# Altium PCB Tablet_Design.PcbDoc (part 6 of 6)
Units mil, origin at the board's own origin, x right, y up, seen from the top; angles counter-clockwise.
Board outline 3823 x 4035 mil, 2 copper layers (Top Layer, Bottom Layer), stack 57 mil thick; 254 components, 256 nets, 1099 pads, 445 vias.
Unrouted connection lines stored in the file: 188.
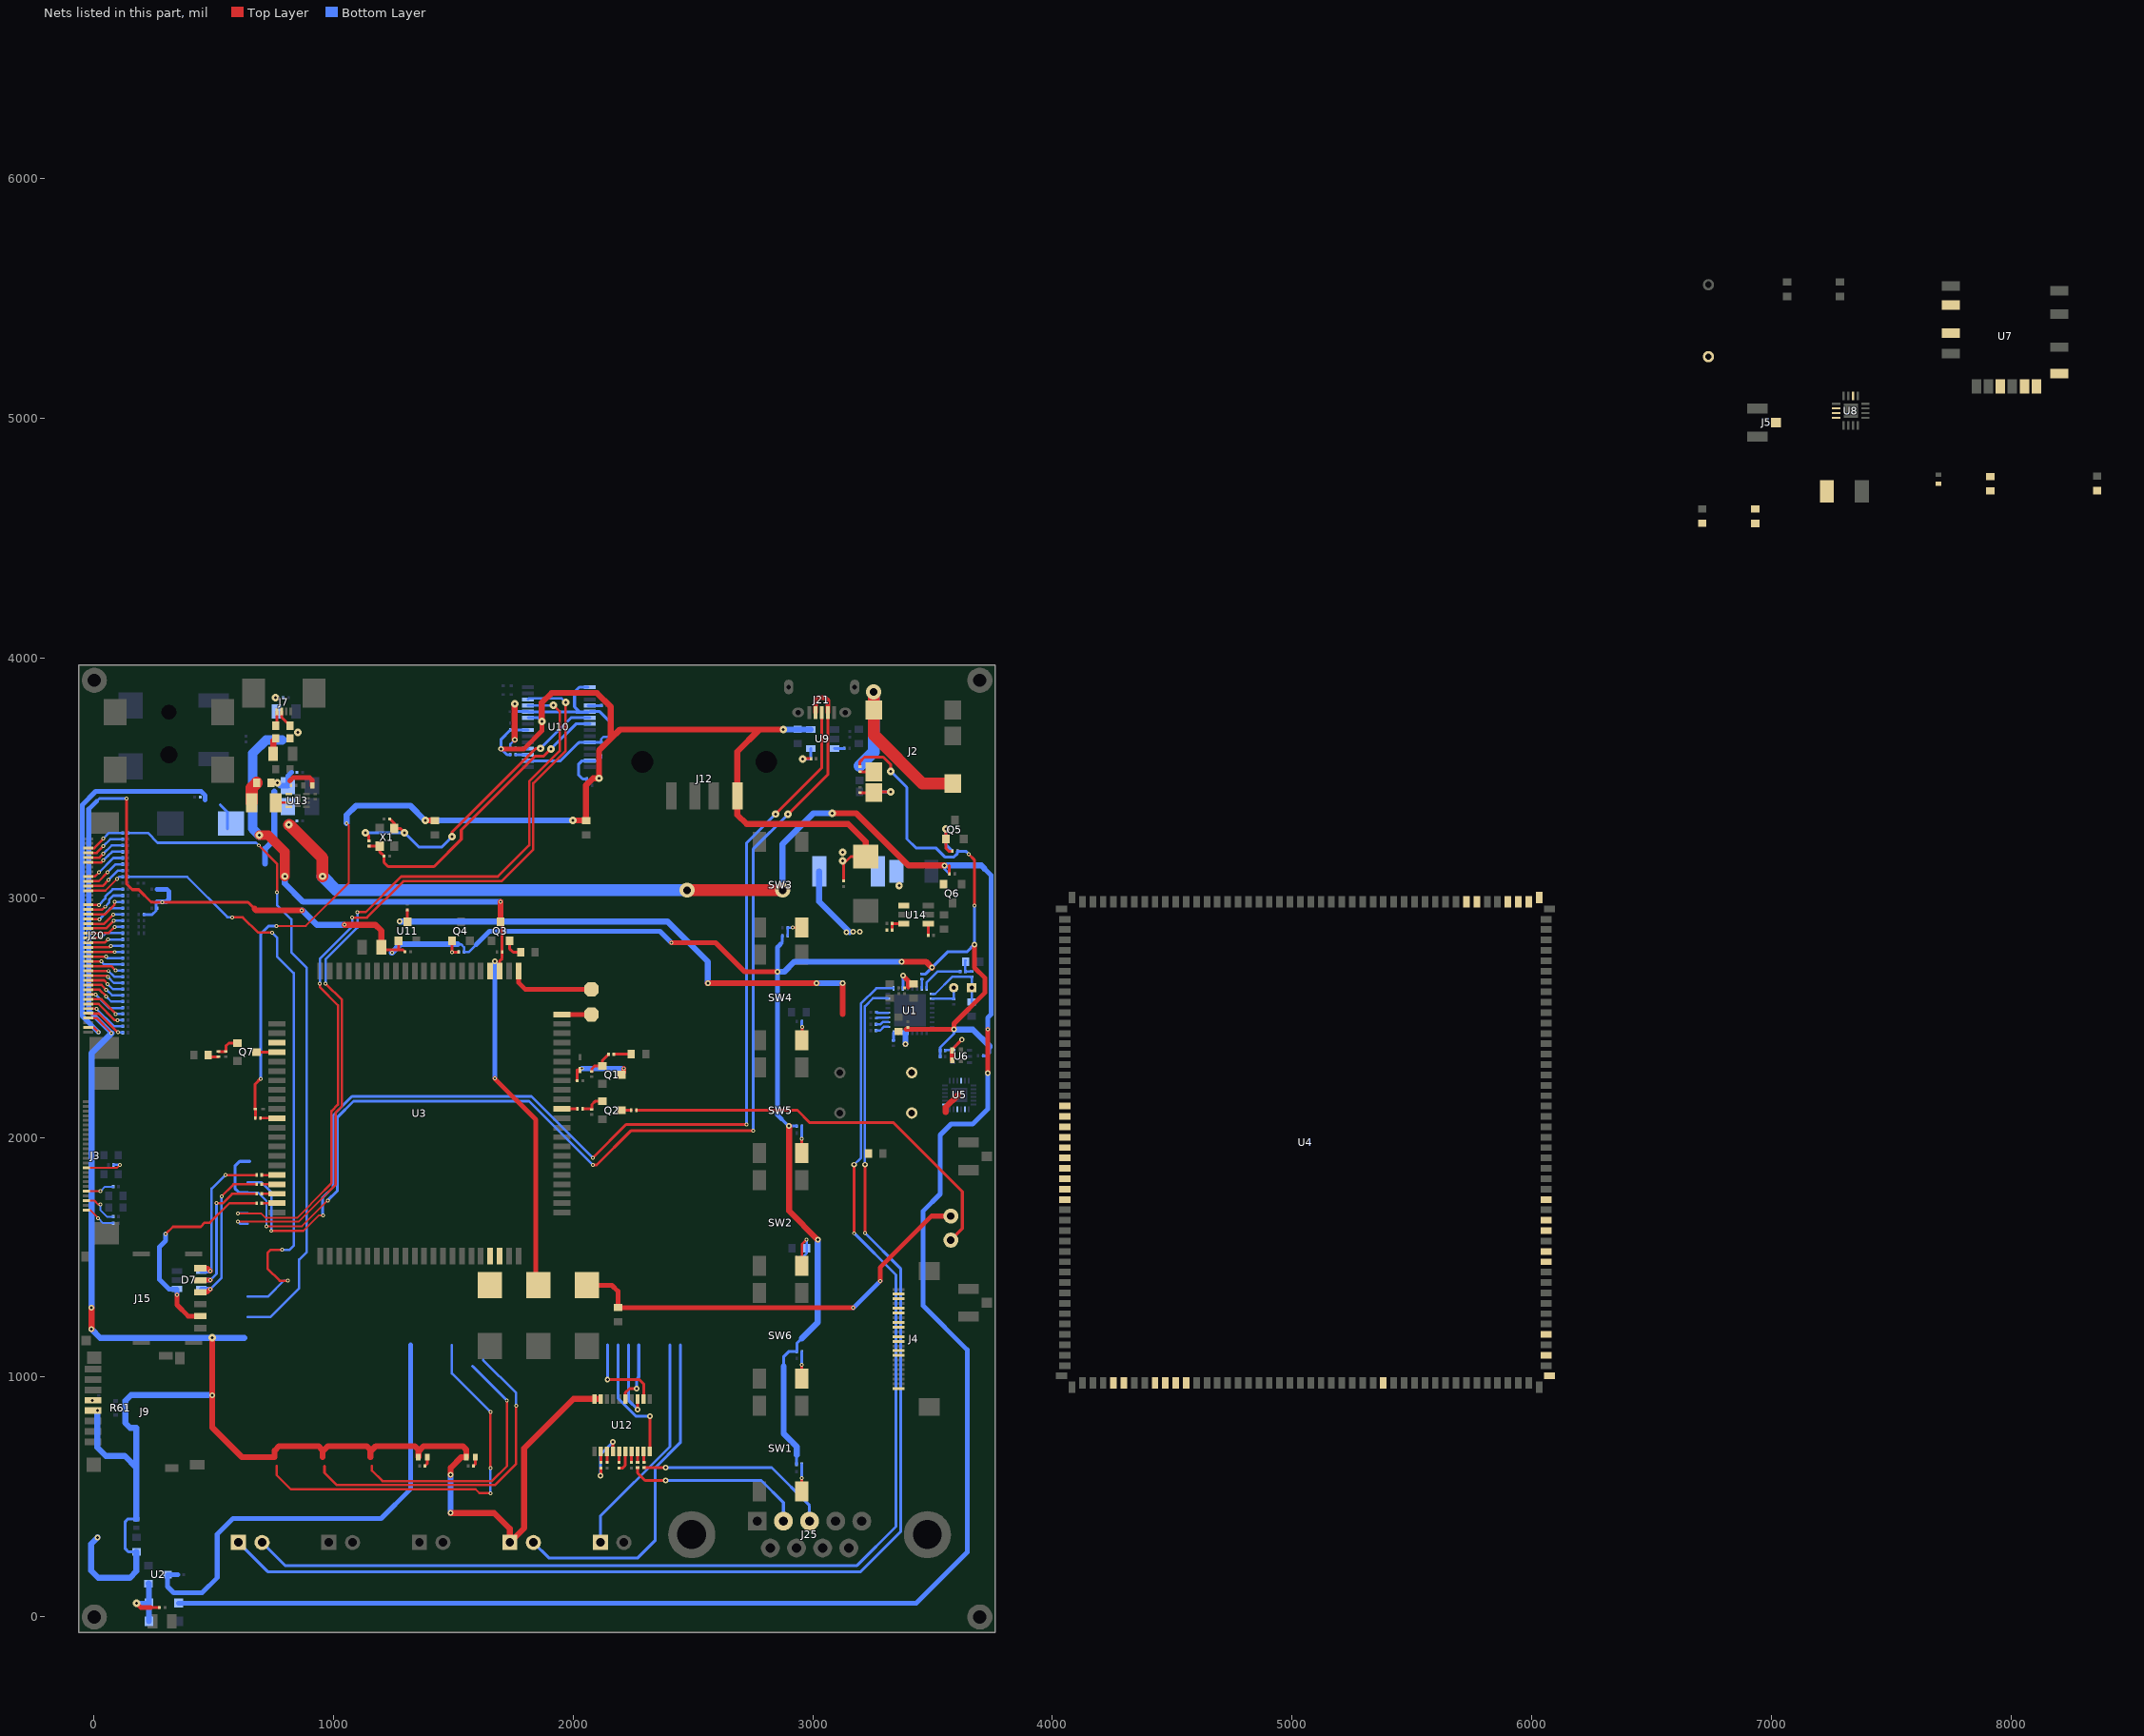
[diagram p3: the nets of this part, all layers, seen from the top]

## Via types
v1: diameter 15.75, hole 7.87, Top Layer to Bottom Layer, tented both sides, 264 vias
v2: diameter 23.62, hole 11.81, Top Layer to Bottom Layer, tented both sides, 101 vias
v3: diameter 31.5, hole 11.81, Top Layer to Bottom Layer, tented both sides, 73 vias
v4: diameter 62.99, hole 31.5, Top Layer to Bottom Layer, tented both sides, 7 vias

## Nets (pads, with @x,y where several pads share a name; then routed paths per layer and width w, separated by ;. In a path a pad name is that pad's centre, name@x,y a point inside that pad or via, vN(x,y) a via of type N, cw(c..) or ccw(c..) an arc to the next point about the centre after c; other vN are vias at no path point) (continued)
MCU_TOUCH_INT: R125.2 U4.3 | length 2775.8
  Top Layer w10: v1(688,3218) 765,3141 v1(765,3022)
  Bottom Layer w10: R125.2@142.83,3270 225.58,3270 266.58,3229 676.75,3229 677.75,3228 678,3228 v1(688,3218) ; 642.06,1250.2 737.2,1250.2 857.13,1370.13 857.13,1490.13 889,1522 889,2706.82 824,2771.82 824,2910 765,2969 v1(765,3022)
MCU_USB+: J21.3 U4.16 | length 4724.8
  Top Layer w8: v1(741,1610) 874.89,1610 939.89,1675 v1(956,1675)
  Top Layer w12: v1(2082,1915) 2220.65,2053.65 v1(2723,2053.65) ; v3(2845,3349) 3037.2,3541.2 J21.3@3037.2,3772.7
  Bottom Layer w10: 642.06,1813.2 698.8,1813.2 741,1771 v1(741,1610)
  Bottom Layer w12: v1(956,1675) 955.13,1675.87 955.13,1749.13 998,1792 998,2091.84 1077.16,2171 1826,2171 v1(2082,1915) ; v1(2723,2053.65) 2723,3227 v3(2845,3349)
MCU_USB-: J21.2 J21.4 U4.15 U4.18 | length 5053.8
  Top Layer w8: v1(720,1629) 868.5,1629 v1(976,1736.5)
  Top Layer w12: v1(2082,1885) 2098.29,1885 2240.29,2027 v1(2751,2027) ; v3(2897,3348) 3062.8,3513.8 J21.2@3062.8,3772.7
  Top Layer w20: J21.4@3011.61,3772.7 3011.61,3822.61 3023,3834 3051,3834 3062.8,3822.2 J21.2@3062.8,3772.7
  Bottom Layer w8: 642.06,1769.89 686.11,1769.89 720,1736 v1(720,1629)
  Bottom Layer w12: 642.06,1769.89 606.11,1769.89 589,1787 589,1880 608.81,1899.81 642.06,1899.81 651.71,1899.81 ; v1(976,1736.5) 1017,1777.5 1017,2083.97 1084.03,2151 1816,2151 v1(2082,1885) ; v1(2751,2027) 2751,3202 v3(2897,3348)
MCU_USB_HOST.MCU_USB_HOST_D+: U4.13 U10.26 | length 3412.6
  Top Layer w8: v1(602,1683.28) 697.72,1683.28 717,1664 848,1664 964,1780
  Top Layer w10: v1(943,2642) 943,2627 1019,2551 1019,2137.04 992,2110.04 992,1809.04 964,1781.04 964,1780 ; v1(1078,2917) 1139.48,2917 1291.48,3069 1701,3069 1834,3202 1834,3477.81 1969,3612.81 v3(1969,3814)
  Bottom Layer w10: v1(602,1683.28) 642.06,1683.28 ; v1(943,2642) 943,2744 1078,2879 v1(1078,2917) ; U10.26@1812.06,3827.16 1815.65,3830.75 1952.25,3830.75 v3(1969,3814)
MCU_USB_HOST.MCU_USB_HOST_D-: U4.12 U10.25 | length 3333.5
  Top Layer w8: v1(602,1649) 856,1649 981,1774
  Top Layer w10: v1(967,2642) 1036,2573 1036,2130 1009,2103 1009,1802 981,1774 ; v1(1100,2940) 1135,2940 1283,3088 1686,3088 1817,3219 1817,3484.85 1944,3611.85 1944,3777 v3(1918,3803)
  Bottom Layer w10: v1(602,1649) 611.03,1639.97 642.06,1639.97 ; v1(967,2642) 967,2742 1100,2875 v1(1100,2940) ; U10.25@1812.06,3801.57 1916.57,3801.57 v3(1918,3803)
MCU_VG_EN: R118.2 U4.5 | length 2529
  Top Layer w10: v1(578,2918) 622,2918 686,2854 v1(744,2854) ; v1(786,1531) 784.87,1529.87 736.77,1529.87 725.13,1518.23 725.13,1452.87 776,1402 v1(810,1402)
  Bottom Layer w10: R118.2@142.83,3087.05 388.95,3087.05 557,2919 578,2919 v1(578,2918) ; 642.06,1336.82 727.82,1336.82 793,1402 v1(810,1402) ; v1(744,2854) 764.67,2833.33 764.67,2754.28 833.87,2685.08 833.87,1547.77 817.11,1531 v1(786,1531)
MIC1N: MK1.2 R3.1 U1.2 | length 138
  Bottom Layer w10: U1.2@3498.39,2579 3585.83,2579 R3.1@3588,2576.83 MK1.2@3588,2624.31
MIC1P: C2.1 MK1.1 R1.1 U1.1 | length 300
  Bottom Layer w10: U1.1@3498.39,2598.68 3510.69,2598.68 3582.48,2670.48 R1.1@3663,2670.48 3663,2624.5 MK1.1@3662.8,2624.31 3662.8,2565.2 C2.1@3663,2565
MICBIAS: R2.1 U1.32 | length 183.1
  Bottom Layer w10: U1.32@3474.77,2622.31 3474.77,2645.77 3521.31,2692.31 R2.1@3615.17,2692.31
MICBIAS#: C1.1 R1.2 R2.2 | length 72
  Bottom Layer w10: C1.1@3637,2738 3636.83,2737.83 R2.2@3636.83,2692.31 3662.83,2692.31 R1.2@3663,2692.13
MIPICSI.MIPICSI_DN0: J4.2 U4.118
MIPICSI.MIPICSI_DN1: J4.5 U4.116
MIPICSI.MIPICSI_DN2: J4.11 U4.114
MIPICSI.MIPICSI_DN3: J4.14 U4.112
MIPICSI.MIPICSI_DNCLK: J4.8 U4.120
MIPICSI.MIPICSI_DP0: J4.3 U4.119
MIPICSI.MIPICSI_DP1: J4.6 U4.117
MIPICSI.MIPICSI_DP2: J4.12 U4.115 | length 1645.6
  Top Layer w10: 763.17,629 763.17,590.83 822,532 1593,532 1609,516 v1(1655,516) ; v1(1655,620) v1(1655,854)
  Bottom Layer w10: 1494.43,1134.06 1494.43,1014.57 v1(1655,854) ; v1(1655,516) v1(1655,620)
MIPICSI.MIPICSI_DP3: J4.15 U4.113 | length 1377
  Top Layer w10: 962.17,600.83 1014,549 1673,549 1762,638 v1(1762,880)
  Top Layer w12: 962.17,600.83 962.17,629
  Bottom Layer w10: 1624.35,1071.65 1762,934 v1(1762,880)
MIPICSI.MIPICSI_DPCLK: J4.9 U4.121 | length 1101.7
  Top Layer w10: 1161.17,629 1161.17,609.33 1204.5,566 1661,566 1724,629 1724,721 v1(1724,902)
  Bottom Layer w12: 1581.04,1044.96 v1(1724,902)
NetC7_1: C7.1 C9.1 U1.27 | length 109.1
  Top Layer w20: v2(3376.35,2675) 3399,2652.35 3399,2628
  Bottom Layer w12: U1.27@3376.35,2622.31 v2(3376.35,2675)
NetC8_2: C8.2 U1.19 | length 48.8
  Bottom Layer w10: C8.2@3265.69,2497.45 3268.49,2500.26 U1.19@3313.35,2500.26
NetC10_2: C10.2 U1.20 | length 48.8
  Bottom Layer w10: C10.2@3265.69,2522.79 3268.53,2519.94 U1.20@3313.35,2519.94
NetC11_2: C11.2 J2.5 R9.1 | length 201.2
  Top Layer w12: R9.1@3197,3438.17 3254.92,3438.17 J2.5@3255.26,3438.51 3257.75,3441 v3(3326,3441)
  Bottom Layer w12: C11.2@3255,3441 v3(3326,3441)
NetC12_2: C12.2 J2.4 J2.6 | length 928
  Top Layer w12: J2.4@3254,3784.26 J2.4@3255.26,3783
  Top Layer w50: J2.4@3254,3784.26 v4(3254,3859) ; J2.4@3255.26,3783 3255.26,3678.74 3458.09,3475.91 J2.6@3584,3475.91
  Bottom Layer w50: C12.2@3195,3549 3254,3608 v4(3254,3859)
NetC18_1: C18.1 U5.10
NetC19_1: C19.1 L1.1 SB6.2
NetC20_1: C20.1 U7.7
NetC33_2: C33.2 R30.1 SW2.3 | length 211.4
  Top Layer w10: SW2.3@2954.58,1454.87 2954.58,1553.58 v1(2974,1573)
  Bottom Layer w10: R30.1@2955,1496 2954.58,1496.42 2974,1515.83 C33.2@2974,1538 v1(2974,1573)
NetC38_2: C38.2 C39.2 R39.1 U6.6 | length 194.5
  Top Layer w12: C39.2@3581.74,2362 3581.74,2367.74 v2(3622,2408)
  Top Layer w20: C38.2@3581.74,2322 C39.2@3581.74,2362
  Bottom Layer w10: R39.1@3553.07,2363 3553.66,2363.59 U6.6@3584.79,2363.59 3584.79,2370.79 v2(3622,2408)
NetC60_1: C60.1 R69.2 R70.2 U10.13 | length 228.9
  Bottom Layer w12: R70.2@2058,3468 R69.2@2058,3495 2040,3495 2022,3513 2022,3556 2037.25,3571.25 U10.13@2069.94,3571.25 2103.75,3571.25 2116.72,3584.22 2116.72,3592.91 C60.1@2117,3593.19
NetC79_1: C79.1 U12.4 | length 240.7
  Top Layer w12: C79.1@2115,620.76 C79.1@2115.43,621.19 v2@2115.43,586 ; U12.4@2166.61,689.75 v2(2166.61,729.61)
  Bottom Layer w12: v2@2115,586 2115,678 v2(2166.61,729.61)
  other v2: 2115,588
NetC79_2: C79.2 U12.2 | length 44.9
  Top Layer w12: C79.2@2115.43,644.81 U12.2@2115.43,689.75
NetC80_1: C80.1 U12.3 | length 45
  Top Layer w12: U12.3@2141.02,689.75 2141.02,644.98 C80.1@2141.19,644.81
NetC81_1: C81.1 U12.7 | length 44.9
  Top Layer w12: C81.1@2243.39,644.81 U12.7@2243.39,689.75
NetC82_1: C82.1 U12.6 | length 87.9
  Top Layer w12: C82.1@2192.2,621.19 2207.19,621.19 2217.8,631.8 U12.6@2217.8,689.75
NetC82_2: C82.2 U12.5 | length 44.9
  Top Layer w12: C82.2@2192.2,644.81 U12.5@2192.2,689.75
NetD4_2: D4.2 R14.2 | length 1722.9
  Top Layer w12: R14.2@2263.83,2113 2936,2113 2988,2061 3336.79,2061 3624,1773.79 3624,1619.48 D4.2@3576,1571.48
NetD12_2: D12.2 L6.1 U14.1
  other v3: 3360,3050
NetJ2_2: J2.2 R8.1 | length 58.3
  Top Layer w12: R8.1@3197,3525.17 3255.21,3525.17 J2.2@3255.26,3525.13
NetJ3_1: J3.1 R27.1 | length 134.8
  Top Layer w8: J3.1@-30.95,1696.62 -15.62,1696.62 v1(18,1663)
  Bottom Layer w8: v1(18,1663) 39,1642 R27.1@81.17,1642
NetJ3_3: J3.3 R26.1 | length 154
  Top Layer w8: J3.3@-30.95,1735.99 3.01,1735.99 19,1720 v1(27.82,1720)
  Bottom Layer w8: v1(27.82,1720) 27.82,1695.95 54.77,1669 R26.1@81.17,1669
NetJ3_5: J3.5 R25.1 | length 119.9
  Top Layer w8: J3.5@-30.95,1775.36 v1(27.82,1775.36)
  Bottom Layer w8: v1(27.82,1775.36) 46.51,1794.05 R25.1@81.17,1794.05
NetJ3_10: J3.10 R24.1 | length 170.8
  Top Layer w8: J3.10@-30.95,1873.79 97.79,1873.79 v1(109,1885)
  Bottom Layer w10: R24.1@82.83,1885 v1(109,1885)
NetJ5_1: J5.1 SB5.1
NetJ7_4: J7.4 SB2.2 | length 62
  Top Layer w12: SB2.2@759,3717 763.47,3721.47 J7.4@763.47,3777.11
NetJ8_1: J8.1 SB3.2 | length 69.1
  Top Layer w25: J8.1@749,3600 749,3655 SB3.2@759,3665
NetJ9_5: J9.5 R60.2 | length 27.3
  Bottom Layer w8: v2(-6,902) 20.17,902 R60.2@21,901.17
NetJ20_5: J20.5 R85.1 | length 177.4
  Top Layer w10: J20.5@-23,2517.45 -21.81,2516.26 21,2516.26 99.26,2438 v1(102,2438)
  Bottom Layer w10: v1(102,2438) 120.31,2438 R85.1@121.17,2437.14
NetJ20_6: J20.6 R86.1 | length 174.4
  Top Layer w10: J20.6@-23,2537.13 v1@10.82,2537.13
  Bottom Layer w10: v1(10.82,2536.13) 82.96,2464 120.23,2464 R86.1@121.17,2463.06
NetJ20_7: J20.7 R87.1 | length 170.2
  Top Layer w10: J20.7@-23,2556.82 20.18,2556.82 88,2489 v1(100,2489)
  Bottom Layer w10: v1(100,2489) R87.1@119.16,2489
NetJ20_8: J20.8 R88.1 | length 170.4
  Top Layer w10: J20.8@-23,2576.5 -22.62,2576.13 31.87,2576.13 91.79,2516.21 v1(91.79,2515)
  Bottom Layer w10: v1(91.79,2515) 121.08,2515 R88.1@121.17,2514.91
NetJ20_9: J20.9 R90.1 | length 168.5
  Top Layer w10: J20.9@-23,2596.19 v1@7,2596.19
  Bottom Layer w10: v1(7,2596) 64,2539 119.34,2539 R90.1@121.17,2540.83
NetJ20_10: J20.10 R92.1 | length 166.5
  Top Layer w10: J20.10@-23,2615.87 24.02,2615.87 52.89,2587 v1@54,2587
  Bottom Layer w10: v1(52,2587) 72.24,2566.76 R92.1@121.17,2566.76
NetJ20_11: J20.11 R94.1 | length 161.9
  Top Layer w10: J20.11@-23,2635.56 32.44,2635.56 v1(52,2616)
  Bottom Layer w10: v1(52,2616) 53.11,2616 76.42,2592.68 R94.1@121.17,2592.68
NetJ20_12: J20.12 R96.1 | length 159.4
  Top Layer w10: J20.12@-23,2655.24 42.76,2655.24 v1(58,2640)
  Bottom Layer w10: v1(58,2640) 79.44,2618.56 R96.1@121.17,2618.56
NetJ20_13: J20.13 R98.1 | length 156.8
  Top Layer w10: J20.13@-23,2674.93 -22.2,2674.13 53.87,2674.13 v1(59,2669)
  Bottom Layer w10: v1(59,2669) 83.57,2644.43 R98.1@121.17,2644.43
NetJ20_14: J20.14 R100.1 | length 154.2
  Top Layer w10: J20.14@-23,2694.61 -22.39,2694 v1(62,2694)
  Bottom Layer w10: v1(62,2694) 62.11,2694 85.8,2670.31 R100.1@121.17,2670.31
NetJ20_15: J20.15 R102.1 | length 151.9
  Top Layer w10: J20.15@-23,2714.3 22.59,2714.3 22.77,2714.13 39.23,2714.13 39.41,2714.3 72.7,2714.3 v1(91,2696)
  Bottom Layer w10: v1(91,2696) 91.11,2695.89 R102.1@121.17,2695.89
NetJ20_16: J20.16 R104.1 | length 149.6
  Top Layer w10: J20.16@-23,2733.98 -22.81,2734.17 30.83,2734.17 v1(31,2734)
  Bottom Layer w10: v1(31,2734) 43.84,2721.16 R104.1@121.17,2721.16
NetJ20_17: J20.17 R105.1 | length 147
  Top Layer w10: J20.17@-23,2753.67 -22.8,2753.87 50.46,2753.87 v1(50.67,2753.67)
  Bottom Layer w10: v1(50.67,2753.67) 57.04,2747.3 R105.1@121.17,2747.3
NetJ20_18: J20.18 R106.1 | length 144.4
  Top Layer w10: J20.18@-23,2773.35 -22.81,2773.54 87.46,2773.54 v1(87.65,2773.35)
  Bottom Layer w10: v1(87.65,2773.35) 121.1,2773.35 R106.1@121.17,2773.43
NetJ20_19: J20.19 R107.1 | length 146.9
  Top Layer w10: J20.19@-23,2793.04 65.04,2793.04 v1(71,2799)
  Bottom Layer w10: v1(71,2799) 120.61,2799 R107.1@121.17,2799.57
NetJ20_20: J20.20 R108.1 | length 149.8
  Top Layer w10: J20.20@-23,2812.72 45.72,2812.72 v1(59,2826)
  Bottom Layer w10: v1(59,2826) 59.3,2825.7 R108.1@121.17,2825.7
NetJ20_21: J20.21 R109.1 | length 152.2
  Top Layer w10: J20.21@-23,2832.41 30.41,2832.41 v1(31,2833)
  Bottom Layer w10: v1(31,2833) 49.84,2851.84 R109.1@121.17,2851.84
NetJ20_22: J20.22 R110.1 | length 154.9
  Top Layer w10: J20.22@-23,2852.09 -22.22,2852.87 61.87,2852.87 v1(87,2878)
  Bottom Layer w10: v1(87,2878) R110.1@121.17,2877.97
NetJ20_23: J20.23 R111.1 | length 157.6
  Top Layer w10: J20.23@-23,2871.78 50.78,2871.78 v1(83,2904)
  Bottom Layer w10: v1(83,2904) 121.07,2904 R111.1@121.17,2904.11
NetJ20_24: J20.24 R112.1 | length 161.3
  Top Layer w10: J20.24@-23,2891.46 -21.66,2890.13 41.02,2890.13 80.89,2930 v1(81,2930)
  Bottom Layer w10: v1(81,2930) 81.24,2930.24 R112.1@121.17,2930.24
NetJ20_25: J20.25 R113.1 | length 167.2
  Top Layer w10: J20.25@-23,2911.15 20.85,2911.15 v1@23,2909
  Bottom Layer w10: v1@21,2911 v1@23,2909 ; v1(23,2910) 55.13,2942.13 55.23,2942.13 66.87,2953.77 66.87,2953.87 69.38,2956.38 R113.1@121.17,2956.38
NetJ20_26: J20.26 R114.1 | length 172.7
  Top Layer w10: J20.26@-23,2930.83 -22.17,2930 45,2930 86.51,2971.51 v1(86.51,2982.51)
  Bottom Layer w10: v1(86.51,2982.51) R114.1@121.17,2982.51
NetJ20_27: J20.27 R115.1 | length 176.4
  Top Layer w10: J20.27@-23,2950.52 -21.61,2949.13 34.13,2949.13 v1(47,2962)
  Bottom Layer w10: v1(47,2962) 65.05,2980.05 65.05,2992.05 81.65,3008.65 R115.1@121.17,3008.65
NetJ20_28: J20.28 R116.1 | length 176.8
  Top Layer w10: J20.28@-22.8,2970 J20.28@-23,2970.2 19.8,2970.2 v1(21,2969)
  Bottom Layer w10: v1(21,2969) 48.05,2996.05 48.05,3003.95 78.89,3034.78 R116.1@121.17,3034.78
NetJ20_31: J20.31 R118.1 | length 168.1
  Top Layer w10: J20.31@-23,3029.26 -22.81,3029.45 48.45,3029.45 v1(98,3079)
  Bottom Layer w10: v1(98,3079) 106.05,3087.05 R118.1@121.17,3087.05
NetJ20_32: J20.32 R120.1 | length 170.8
  Top Layer w10: J20.32@-23,3048.94 36.94,3048.94 v1(62,3074)
  Bottom Layer w10: v1(62,3074) 101.19,3113.19 R120.1@121.17,3113.19
NetJ20_33: J20.33 R121.1 | length 173.5
  Top Layer w10: J20.33@-23,3068.63 20.63,3068.63 v1(58,3106)
  Bottom Layer w10: v1(58,3106) 91.32,3139.32 R121.1@121.17,3139.32
NetJ20_34: J20.34 R117.1 | length 176.1
  Top Layer w10: J20.34@-23,3088.31 4.31,3088.31 v1(21,3105)
  Bottom Layer w10: v1(21,3105) 81.46,3165.46 R117.1@121.17,3165.46
NetJ20_37: J20.37 R122.1 | length 162.7
  Top Layer w10: J20.37@-23,3147.37 32.37,3147.37 v1(40,3155)
  Bottom Layer w10: v1(40,3155) 40.11,3155 59.87,3174.77 59.87,3174.87 77,3192 R122.1@121.17,3192
NetJ20_38: J20.38 R123.1 | length 165.3
  Top Layer w10: J20.38@-23,3167.06 23.95,3167.06 31.77,3174.87 31.87,3174.87 v1(40,3183)
  Bottom Layer w10: v1(40,3183) 75,3218 R123.1@121.17,3218
NetJ20_39: J20.39 R124.1 | length 167.9
  Top Layer w10: J20.39@-23,3186.74 11.74,3186.74 v1(40,3215)
  Bottom Layer w10: v1(40,3215) 69,3244 R124.1@121.17,3244
NetJ20_40: J20.40 R125.1 | length 171.7
  Top Layer w10: J20.40@-23,3206.43 2.4,3206.43 40,3244.03 v1(40,3246)
  Bottom Layer w10: v1(40,3246) 64,3270 R125.1@121.17,3270
NetL5_1: L5.1 U13.7 | length 54.2
  Top Layer w10: L5.1@759.2,3396 U13.7@813.44,3396
NetL5_2: L5.2 SB4.1 | length 91.8
  Top Layer w50: L5.2@658.8,3396 658.8,3457.8 SB4.1@680,3479
NetLED4_2: LED4.2 R23.2 | length 41.1
  Top Layer w12: R23.2@1381.65,629 1391.5,638.85 LED4.2@1391.5,666
NetLED5_2: LED5.2 R82.2 | length 40.1
  Top Layer w12: R82.2@1584.08,629 1591.5,636.42 LED5.2@1591.5,666
NETLIGHT: R15.2 U3.51 | length 65
  Top Layer w12: U3.51@1953.28,2119.2 2017.98,2119.2 R15.2@2018.17,2119
NetP1_1: P1.1 U3.85 | length 123.8
  Top Layer w20: U3.85@1953.28,2512.9 2076.9,2512.9 P1.1@2077,2513
NetP2_1: P2.1 U3.87 | length 364.9
  Top Layer w20: U3.87@1772.18,2694 1772.18,2645.82 1801,2617 P2.1@2077,2617
NetQ1_1: Q1.1 R11.1 R13.1 | length 120.1
  Top Layer w12: R11.1@2078,2274.83 2078,2286 2090.4,2298.4 Q1.1@2122.63,2298.4 2122.63,2321.46 R13.1@2148.17,2347
NetQ2_1: Q2.1 R15.1 R16.1 | length 109.4
  Top Layer w12: R15.1@2039.83,2119 2075.83,2119 R16.1@2078,2116.83 2078,2137 2091.4,2150.4 Q2.1@2122.63,2150.4
NetQ2_3: Q2.3 R14.1 | length 40.8
  Top Layer w12: Q2.3@2201.37,2113 R14.1@2242.17,2113
NetQ4_1: Q4.1 R17.1 R19.1 | length 101.6
  Top Layer w12: v1@1494.6,2773 Q4.1@1494.6,2820.63 ; v1@1495,2772 R19.1@1520.83,2772
  Bottom Layer w12: v1(1495,2773) R17.1@1523.17,2774
NetQ5_1: Q5.1 R131.1 R132.1 | length 217.1
  Top Layer w12: v3(3556,3287) 3556,3245.36 Q5.1@3555.27,3244.63 3555.27,3205.73 3567,3194 R132.1@3582.01,3194
  Bottom Layer w12: v3(3556,3287) 3556,3219.83 R131.1@3582.01,3193.83
NetQ7_1: Q7.1 R134.1 R135.1 | length 107.9
  Top Layer w12: R134.1@520,2357.83 R135.1@551,2357.83 551,2381 563.4,2393.4 Q7.1@599.63,2393.4
NetR4_2: R4.2 U1.16 | length 33.7
  Bottom Layer w12: R4.2@3336.69,2403.65 3336.98,2403.94 U1.16@3336.98,2437.27
NetR5_2: R5.2 U1.17 | length 55.9
  Bottom Layer w10: R5.2@3263.7,2445.79 3280.83,2445.79 3295.93,2460.89 U1.17@3313.35,2460.89
NetR6_1: R6.1 U1.31 | length 37.7
  Bottom Layer w10: R6.1@3454.87,2659.96 3454.87,2622.52 U1.31@3455.09,2622.31
NetR7_2: R7.2 U1.18 | length 52.2
  Bottom Layer w10: R7.2@3264.7,2472.12 3283.12,2472.12 3291.57,2480.57 U1.18@3313.35,2480.57
NetR13_2: R13.2 SB9.2 | length 73.2
  Top Layer w12: R13.2@2169.83,2347 SB9.2@2243,2347
NetR28_1: R28.1 R29.1 SW1.3 | length 113.7
  Top Layer w12: v1(2954,579) 2954.58,579 SW1.3@2954.58,522.87
  Bottom Layer w12: v1(2954,579) R29.1@2954,606 R28.1@2954,636
NetR31_1: R31.1 R32.1 SW3.3 | length 93.8
  Top Layer w10: v1(2917,2875) 2917.13,2874.87 SW3.3@2954.58,2874.87
  Bottom Layer w10: R31.1@2894.83,2841 R32.1@2894.83,2875 v1(2917,2875)
NetR33_1: R33.1 SW4.3 | length 79.8
  Top Layer w12: SW4.3@2954.58,2404.47 2955,2404.88 v1(2955,2461)
  Bottom Layer w12: R33.1@2954.83,2484 2954.83,2461.17 v1(2955,2461)
NetR34_1: R34.1 R35.1 SW5.3 | length 113
  Top Layer w12: SW5.3@2954.58,1934.07 SW5.3@2954.65,1934.14 ; SW5.3@2954.65,1934.07 SW5.3@2954.65,1934.14 ; v1(2954.65,1993.35) SW5.3@2954.65,1934.14
  Bottom Layer w12: v1(2954.65,1993.35) R35.1@2954.65,2018 R34.1@2954.65,2047
NetR36_1: R36.1 R37.1 SW6.3 | length 123.5
  Top Layer w12: SW6.3@2953.58,981.87 v1@2953.58,1052
  Bottom Layer w12: v1@2953,1052 v1@2954,1053 ; v1(2954,1052) v1@2954,1053 ; R36.1@2954,1104 2954,1075 v1@2954,1053
NetR66_1: R66.1 U9.3 | length 39.9
  Bottom Layer w12: U9.3@3090.21,3622.63 3090.58,3623 R66.1@3130,3623
NetR67_1: R67.1 R68.1 U9.4 | length 112.6
  Top Layer w12: v3(2958,3579) 2959,3580 R68.1@2992.17,3580
  Bottom Layer w12: v3(2958,3579) R67.1@2992.17,3579 2992.17,3622.24 U9.4@2991.79,3622.63
NetR71_2: R71.2 U10.4 | length 56.2
  Bottom Layer w12: U10.4@2061.94,3801.57 R71.2@2118.17,3801.57
NetR72_1: R72.1 U10.17 | length 52.3
  Bottom Layer w12: R72.1@1759.83,3596.67 1811.89,3596.67 U10.17@1812.06,3596.84
NetR73_1: R73.1 U10.18 | length 52.5
  Bottom Layer w12: R73.1@1759.83,3623 1811.5,3623 U10.18@1812.06,3622.43
NetR74_1: R74.1 R75.1 U10.21 | length 81
  Bottom Layer w12: R75.1@1759.83,3728 R74.1@1759.83,3699.2 U10.21@1812.06,3699.2
NetR77_2: R77.2 U3.17 | length 63.7
  Top Layer w10: R77.2@700.83,1843 763.7,1843 U3.17@764.31,1843.61
NetR78_2: R78.2 U3.18 | length 63.6
  Top Layer w10: R78.2@700.83,1804 701.06,1804.24 U3.18@764.31,1804.24
NetR79_2: R79.2 U3.19 | length 63.6
  Top Layer w10: R79.2@700.83,1764.5 701.19,1764.87 U3.19@764.31,1764.87
NetR80_2: R80.2 U3.20 | length 63.7
  Top Layer w10: R80.2@700.83,1725 701.32,1725.5 U3.20@764.31,1725.5
NetR83_2: R83.2 U12.8 | length 45.9
  Top Layer w12: R83.2@2268.98,643.85 U12.8@2268.98,689.75
NetR84_1: R84.1 U12.9 | length 46.5
  Top Layer w12: U12.9@2294.57,689.75 2294.57,645.26 R84.1@2296,643.83
NetR128_1: R128.1 U14.4 | length 50.5
  Top Layer w12: R128.1@3482.17,2843 U14.4@3482.18,2891.6
  Top Layer w20: U14.4@3482.18,2891.6 U14.4@3483.49,2890.29
NetR129_2: R129.2 R130.2 U14.3 | length 76.6
  Top Layer w12: R130.2@3331.23,2891.6 U14.3@3379.82,2891.6 ; R129.2@3331.83,2864 R130.2@3331.83,2892
NetR134_2: R134.2 SB10.2 | length 45.2
  Top Layer w12: SB10.2@478,2344 485.83,2336.17 R134.2@520,2336.17
PC_RXD1: J25.3 R84.2 | length 821.5
  Top Layer w12: R84.2@2296,622.17 2296.17,622 v2(2386,622)
  Bottom Layer w12: v2(2386,622) 2829,622 2986.58,464.42 J25.3@2986.58,398.81
PC_TXD1: J25.2 R83.1 | length 759.5
  Top Layer w12: R83.1@2269,622.17 2269,600 2300,569 v2(2386,569)
  Bottom Layer w12: v2(2386,569) 2785,569 2877.53,476.47 J25.2@2877.53,398.81
PWR_ON#: C15.1 D3.1 Q1.3 U3.3 | length 259.3
  Top Layer w12: C15.1@2015.88,2237.31 C15.1@2016.19,2237 2016.19,2279.19 2018.43,2281.43 D3.1@2028,2281.43
  Top Layer w20: Q1.3@2201.37,2261 2211,2270.63 v1(2211,2287)
  Bottom Layer w20: v1(2037,2287) v1(2211,2287)
RESET#: Q7.3 U3.4 | length 86.2
  Top Layer w12: Q7.3@678.37,2356 678.95,2355.42 U3.4@764.31,2355.42
RF: SB5.2 SB6.1 U7.6
SPKR_LN: J1.2 U1.25 | length 5179.9
  Top Layer w12: v1(3173,1600) v2(3173,1886)
  Bottom Layer w10: v2(3173,1886) 3200.5,1913.5 3200.5,2557.5 3265.31,2622.31 U1.25@3336.98,2622.31
  Bottom Layer w12: J1.2@702.21,310 798.21,214 3185,214 3347,376 3347,1426 v1(3173,1600)
SPKR_LP: J1.1 U1.23 | length 5243.6
  Top Layer w12: v1(3218,1601) v2(3218,1886)
  Bottom Layer w10: v2@3217.5,1886 3217.5,2546.5 3251.75,2580.75 U1.23@3311.58,2580.75
  Bottom Layer w12: J1.1@603.79,310 725.79,188 3200,188 3366,354 3366,1453 v1(3218,1601)
SUSPEND: U7.14 U8.4
SYNC: U7.11 U8.2
UART_SIG.UARTRXD0: U4.149 U12.10 | length 533.4
  Top Layer w12: v2(2320,837) 2320,689.91 U12.10@2320.16,689.75
  Bottom Layer w12: 2187.34,1134.06 2187.34,911.57 2261.91,837 v2(2320,837)
UART_SIG.UARTRXD1: U4.147 U12.15 | length 256.6
  Top Layer w12: U12.15@2217.8,908.25 2217.8,934.8 2235,952 v2(2265,952)
  Bottom Layer w12: v2@2265,962 2265,991 2273.95,999.95 2273.95,1134.06
UART_SIG.UARTRXD3: J16.2 U4.143 | length 1423.5
  Bottom Layer w12: J16.2@1834.45,310 1898.45,246 2270,246 2343,319 2343,622 2447.18,726.18 2447.18,1134.06
UART_SIG.UARTTXD0: U4.150 U12.12 | length 367.3
  Top Layer w12: v2(2143,989) 2276.57,989 2294.57,971 U12.12@2294.57,908.25
  Bottom Layer w12: v2(2143,989) 2143,1133.03 2144.03,1134.06
UART_SIG.UARTTXD1: U4.148 U12.13 | length 328.2
  Top Layer w12: v2(2269,865) U12.13@2268.98,908.25
  Bottom Layer w12: 2230.65,1134.06 2230.65,903.35 v2(2269,865)
UART_SIG.UARTTXD3: J17.1 U4.144 | length 944.4
  Bottom Layer w12: J17.1@2113.44,310 2113.44,419.44 2403.87,709.87 2403.87,1134.06
USIM_CLK: D7.5 J15.C3 R79.1 | length 597.7
  Top Layer w10: v1@509,1726 v1(512,1726) 539,1726 577.5,1764.5 R79.1@679.17,1764.5
  Top Layer w20: J15.C3@443.98,1404.2 v1@486.6,1404.2
  Bottom Layer w10: v1(486.6,1405) 512,1430.4 v1(512,1726)
  Bottom Layer w20: D7.5@449.18,1405 v1(486.6,1405)
USIM_DATA: D7.4 J15.C7 R77.1 | length 641.5
  Top Layer w10: v1(549,1843) R77.1@679.17,1843
  Top Layer w20: J15.C7@443.98,1454.2 474.8,1454.2 v1(486.6,1442.4)
  Bottom Layer w10: v1(486.6,1442.4) 492.13,1447.93 492.13,1786.13 v1(549,1843)
  Bottom Layer w20: D7.4@449.18,1442.4 v1(486.6,1442.4)
USIM_RST: D7.6 J15.C2 R78.1 | length 658.1
  Top Layer w10: v1(533,1754) 583,1804 R78.1@679.17,1804
  Top Layer w20: J15.C2@443.98,1354.2 473.2,1354.2 v1(486.6,1367.6)
  Bottom Layer w10: v1(486.6,1367.6) 533.13,1414.13 v1@533.13,1754
  Bottom Layer w20: D7.6@449.18,1367.6 v1(486.6,1367.6)
USIM_VDD: D7.1 J15.C1 R80.1 | length 904.9
  Top Layer w10: v1(300.45,1597) 330.32,1626.87 445.98,1626.87 463.11,1644 485,1644 566,1725 R80.1@679.17,1725
  Top Layer w20: v1@347,1343.18 v1(347,1343) 347,1301 393.8,1254.2 J15.C1@443.98,1254.2
  Bottom Layer w20: v1(300.45,1597) 300.45,1569.45 274,1543 274,1407.28 313.68,1367.6 D7.1@346.82,1367.6 346.82,1343.18 v1(347,1343)
V33_HUB: C63.1 C64.1 R73.2 U10.1 U10.5 U10.10 U10.16 U10.24 | length 1246.7
  Top Layer w25: v2(1756,3658.82) v3(1756,3808)
  Bottom Layer w10: R73.2@1738.17,3623 1738.17,3640.99 v2(1756,3658.82) ; C63.1@2117.19,3648 2117.19,3661.19 2127,3671 2145,3671 2155,3681 2155,3692
  Bottom Layer w12: v3(1756,3808) 1760.81,3803.19 C64.1@1760.81,3775.98 U10.24@1812.06,3775.98 1813.79,3774.25 2011.3,3774.25 ; v3@1760.81,3807.81 1761,3808 v3@1761,3813 ; U10.16@1804.06,3571.25 U10.16@1812.06,3571.25 1947.38,3571.25 2021,3644.87 2021.91,3644.87 2025.07,3648.02 U10.10@2069.94,3648.02 C63.1@2116.17,3648.02 ; 2013.02,3773.98 2028.02,3773.98 ; U10.5@2061.94,3773.98 2028.02,3773.98 ; U10.1@2061.94,3878.34 2026.34,3878.34 2006,3858 2006,3796 2028.02,3773.98 ; U10.5@2069.94,3775.98 2111.02,3775.98 2155,3732 2155,3692
VBAT: C21.1 C22.1 C23.1 C24.1 C25.1 C26.1 C51.1 C52.1 D4.1 J7.3 J20.2 Q3.3 R18.2 SB2.1 SB3.1 U3.38 U3.39 U3.62 U3.63 U4.49 U4.50 | length 6983.9
  Top Layer w10: J20.2@-23,2458.39 -0.44,2458.39 v1(19,2438.96)
  Top Layer w12: J7.3@783.16,3777.11 783.16,3752.84 SB2.1@819,3717 ; U3.62@1693.44,2694 1693.44,2735.44 1703.83,2745.83 R18.2@1703.83,2774 1703.83,2893.54 Q3.3@1697.5,2899.87
  Top Layer w20: v1(1673,2245.83) 1845,2073.83 1845,1392.71 C23.1@1854.71,1383 ; C25.1@2057.42,1383 2161.83,1383 2187,1357.83 C22.1@2187,1290 v1(3168,1290) ; v1(3281,1400) 3281,1457 3495.48,1671.48 D4.1@3576,1671.48
  Top Layer w25: Q3.3@1697,2899.37 v1(1697,2982.51)
  Top Layer w40: v3(691,3260) 728,3260 797,3191 v3(797,3089)
  Bottom Layer w12: 528,3387 557.77,3357.23 C26.1@557.77,3286
  Bottom Layer w20: v1(19,2438.96) -48,2505.96 -48,3387 8,3443 448,3443 465,3426 465,3408 ; v1@1674,2245.83 v2(1674,2734) ; v1(3168,1290) 3171,1290 v1(3281,1400)
  Bottom Layer w25: v3(797,3089) 797,3059 873.5,2982.5 v1(1697,2982.51)
  Bottom Layer w40: v3(691,3260) 663,3288 663,3602 719,3658 786,3658
  other v3: 851,3690 759,3835
VBAT_SYS: C40.2 C84.1 C85.1 D1.1 Q6.2 R133.2 U4.53 U4.54 U13.8 | length 9966
  Top Layer w12: 3569.19,3134.19 3569.19,3099.98 R133.2@3570.17,3099
  Top Layer w20: v2(3730,2268) v1(3730,2450)
  Top Layer w25: v3(3081,3352) 3181,3352 3398.81,3134.19 v2(3549.19,3134.19)
  Top Layer w50: v3@815,3304 954.23,3164.77 v3(954.23,3089) ; v4(2475,3031.25) 2869.75,3031.25 v4@2874,3027
  Bottom Layer w12: v2(3549.19,3134.19) 3549.19,3120 C40.2@3569.19,3100
  Bottom Layer w20: D1.1@354.01,57 3432,57 3644,269 3644,1114 3461,1297 3461,1693 3532,1764 3532,2010 3577.5,2055.5 3667.5,2055.5 3730,2118 v2(3730,2268) ; 3716.5,3120.5 3743.81,3093.19 3743.81,2513.09 3730,2499.28 v1(3730,2450)
  Bottom Layer w25: v4(2874,3031.25) 2874,3223 3003,3352 v3(3081,3352) ; v2(3549.19,3134.19) 3702.81,3134.19 3716.5,3120.5
  Bottom Layer w50: v3(954.23,3089) 1011.98,3031.25 v4(2475,3031.25)
  other v3: 814,3304
VBAT_SYS#: C13.1 D1.2 D2.2 U2.1 | length 312.2
  Top Layer w12: 238,38 C13.1@274.19,38
  Top Layer w20: v3(179,56) 197,38 238,38
  Bottom Layer w20: v3(179,56) 228.99,56 D1.2@229.99,57
  Bottom Layer w25: U2.1@228.63,138.6 229.99,137.24 D1.2@229.99,57 D2.2@229.99,-19
VBAT_USB: C57.1 C61.1 C62.1 C90.1 C91.1 D9.1 D12.1 J12.1 R69.1 R72.2 R74.2 R81.2 R129.1 U9.5 U10.23 | length 6386.9
  Top Layer w8: v1(762,2882) 884.3,2882 1064,3061.7 1064,3302 v1(1055,3311)
  Top Layer w12: R81.2@674.17,2080 674.17,2117.29 D9.1@673.46,2118 673.46,2222.46 v1(696,2245) ; C91.1@3129,3069.81 3129,3142 3158,3171 C90.1@3221,3171
  Top Layer w20: v2(1700,3621) 1795,3621 1869.25,3695.25 v3(1869.25,3735.25)
  Top Layer w25: v3(1383,3322) C61.1@1423,3322 C61.1@1422.8,3322.2 ; v3(1869.25,3735.25) 1869.25,3813.25 1910,3854 2100,3854 2157.25,3796.75 2157.25,3663.25 ; v3(1999,3322) C62.1@2055,3322 2054.13,3322.87 2054.13,3425.06 2054.13,3469.13 2083,3498 v3(2108,3498) 2108,3614 2157.25,3663.25 ; v3(2877.37,3701.37) 2777.37,3701.37 ; C90.1@3221,3171 3221,3234 3148,3307 2724,3307 2685.46,3345.54 J12.1@2685.46,3425.06 2685.46,3609.46 2777.37,3701.37 ; 2157.25,3663.25 2195.37,3701.37 2777.37,3701.37
  Bottom Layer w12: v1(696,2245) 696,2848 730,2882 v1(762,2882) ; R72.2@1738.17,3596.67 1724.33,3596.67 v2(1700,3621) 1700,3661.03 R74.2@1738.17,3699.2 ; U10.23@1812.06,3750.39 1854.11,3750.39 v3(1869.25,3735.25) ; R69.1@2079.65,3495 v3@2108,3495
  Bottom Layer w25: v1(1055,3311) 1055,3345 1094,3384 1321,3384 v3(1383,3322) v3(1999,3322) ; v3(2877.37,3701.37) U9.5@2991.79,3701.37 ; D12.1@3026.76,3110 3026.76,2983.24 3153,2857
  other v2: 3141,2856 3169,2857 3197,2857
  other v3: 3124,3154 3124,3189
VBAT_USB1: R81.1 U3.11 | length 68.8
  Top Layer w10: R81.1@695.83,2079 696.65,2079.83 U3.11@764.31,2079.83
VCC1P0_CORE_DC: C86.1 C87.1 C88.1 R126.2 SB4.2 U4.47 U4.48 U13.5 | length 552.6
  Top Layer w20: 818,3487 832.5,3501.5 900.5,3501.5 911.5,3490.5 C86.1@911.5,3468
  Bottom Layer w20: C87.1@810,3467 810,3508 825,3523
  Bottom Layer w25: 714.9,3141.94 714.9,3204.9 753,3243 753,3442 ; v3(767,3479) 779,3467 C87.1@810,3467
VCC3P8SIM: C27.2 Q3.2 | length 88.1
  Top Layer w12: Q3.2@1734.4,2821.63 1734.4,2787.6 1750,2772 C27.2@1782,2772
"VCC 1P8_LDO": C36.2 C37.2 C78.1 U5.8 U5.13 U5.22 U11.3 | length 2286.9
  Top Layer w12: U11.3@1309,2899.37 C78.1@1309,2949.19
  Top Layer w25: v2(2562,2643) v2(3016,2643) ; 3125,2514 v2(3125,2643) ; C37.2@3413,2270 C37.2@3422,2270 ; 3555,2105.39 3555,2125.69 3605.31,2176
  Bottom Layer w25: v2(1277,2901) 2394,2901 2562,2733 v2(2562,2643) ; v2(3016,2643) v2(3125,2643)
"VCC 1P8_RTC": C14.1 U2.3 U4.169 | length 2005.5
  Bottom Layer w20: C14.1@351.19,176 U2.3@307.37,176 307.37,125.63 333,100 452,100 515,163 515,344 581,410 1199,410 1321.2,532.2 1321.2,1134.06
"VCC 3P3_SYS": C3.1 C4.1 C28.1 C35.1 C41.1 C53.1 C54.1 C77.1 J4.22 J9.4 J16.1 J20.4 LED4.1 LED5.1 R6.2 R8.2 R17.2 R28.2 R31.2 R34.2 R36.2 R38.2 R39.2 R40.2 R61.1 R61.2 R61.3 R61.4 R89.2 R91.2 R93.2 R95.2 R131.2 U1.13 U1.14 U4.1 U7.1 U8.14 U11.1 U12.19 U12.20 | length 17532.5
  Top Layer w10: J20.4@-23,2497.76 12.34,2497.76 74.16,2435.95 v1(74.16,2435)
  Top Layer w12: v1(136,3414) 136,3058.4 161,3033.4 187.6,3033.4 240,2981 v1(286,2981) 644,2981 670.5,2954.5 ; C28.1@1199,2782 1271.6,2782 ; U11.1@1271.6,2820.63 1271.6,2782 ; C77.1@1298.19,2774 1290.19,2782 1271.6,2782 ; R8.2@3197,3546.83 3197,3567 3216,3586 3294.26,3586 3326,3554.26 v3(3326,3527) ; v1(3651,3181) 3674,3158 v1(3674,2967)
  Top Layer w20: v1(2410,2812) 2595,2812 2716,2691 v2(2852,2691) ; 3389,2450 v2(3589,2450) 3589,2474.5 3717.35,2602.86 3717.35,2665.65 3674,2709 v2(3674,2805)
  Top Layer w25: v2(-9.37,1200) v2(-9.37,1289) ; v3(494,1163.59) v2(494,924) 494,790 618,666 754.5,666 754.5,693.5 773,712 938,712 954.5,695.5 954.5,689.5 ; 670.5,2954.5 678,2947 v1(868,2947) ; 954.5,666 954.5,689.5 ; v1(1046,2887) 1175,2887 1200,2862 C28.1@1200,2793.04 ; 1154.5,666 1154.5,689.5 ; LED4.1@1354.5,666 1354.5,689.5 ; v2(1489,433) 1671,433 1736.03,367.97 J16.1@1736.03,310 1796,369.97 1796,703 2002,909 2103,909 ; v2(1489,592) 1489,622 1533,666 LED5.1@1554.5,666 1554.5,696.5 1539,712 1377,712 1354.5,689.5 ; v2(2901,2047) 2901,1693 v2(3021,1573) ; v2(3371,2733) 3472,2733 v2(3497,2708) ; 954.5,689.5 977,712 1139,712 1154.5,696.5 1154.5,689.5 ; 1154.5,689.5 1177,712 1339,712 1354.5,696.5 1354.5,689.5
  Bottom Layer w10: 1517,2806 1532,2806 1544.83,2793.17 1544.83,2773 1564,2773 1595.5,2804.5
  Bottom Layer w12: 11,3401 24,3414 v1(136,3414) ; C53.1@178,271 144,271 131.37,283.63 131.37,312.63 131.37,332.31 131.37,352 131.37,371.68 131.37,397.37 141.5,407.5 C54.1@178,407.5 ; R89.2@208.83,2930 244.33,2930 259.83,2945.5 259.83,2982 R93.2@263.83,2982 ; 2865.5,2805.5 2873.17,2813.17 R31.2@2873.17,2841 ; 2868,2078 2899,2047 v2(2901,2047) R34.2@2933,2047 ; 2879,1045 2879,1086 2899,1106 R36.2@2933.35,1106 2933.35,1140.35 2954,1161 ; R28.2@2932.35,636 2932.35,674 2933.35,675 ; v3(3326,3527) 3393,3460 3393,3245 3430,3208 3513,3208 3551,3170 3589.16,3170 3603.66,3184.5 R131.2@3603.66,3193.83 3638.17,3193.83 v1(3651,3181) ; R6.2@3454.87,2681.61 3470.61,2681.61 v2(3497,2708) 3562.43,2773.43 3642.43,2773.43 v2(3674,2805) v1(3674,2967) ; R40.2@3531.41,2336 R39.2@3531.41,2363 3531.41,2375.41 3589,2433 v2(3589,2450) ; R38.2@3711.07,2340 3726,2340 3738,2352 3738,2377
  Bottom Layer w20: 11,3401 -21,3369 -21,2530.16 v1(74.16,2435) ; R93.2@263.83,2982 302,2982 313,2993 313,3027 305,3035 R95.2@263.83,3035 ; 1595.5,2804.5 1651,2860 2362,2860 v1(2410,2812) ; 2865.5,2805.5 2852,2792 v2(2852,2691) 2852,2094 2868,2078
  Bottom Layer w25: v2(-9.37,1200) 27.04,1163.59 v3(494,1163.59) 628.06,1163.59 ; v2(-9.37,1289) -9.37,2351.47 v1(74.16,2435) ; v2(16,331) -11,304 -11,193 19,163 151,163 178,190 C53.1@178,271 ; v2(16,860) 14.75,858.75 14.75,707.25 51,671 129.19,671 178,622.19 ; C54.1@178,407.5 178,622.19 ; v2@494,924.5 178,924.5 155.19,924.5 R61.1@131.37,900.68 R61.2@131.37,881 R61.3@131.37,861.31 R61.4@131.37,841.63 131.37,808.63 152,788 178,788 178,622.19 ; v1(868,2947) 871,2947 931,2887 v1(1046,2887) ; v1(1244,2770) 1280,2806 1517,2806 ; v2(1489,433) v2(1489,592) ; v2(2852,2691) 2881,2691 2923,2733 v2(3371,2733) ; 2878.5,1044.5 2878.5,764.5 2933.35,709.65 2933.35,675 ; 2954,1161 3021,1228 v2(3021,1573) ; v2(3387,2389.65) 3387,2436 ; v2(3589,2450) 3668.16,2450 3738,2380.16 3738,2377
WOW: U7.13 U8.3
XTAL1: C66.2 R76.1 U10.6 X1.1 | length 1335.5
  Top Layer w12: v3(1133,3271) 1148,3256 R76.1@1148,3236.83 ; C66.2@1234.81,3329 1253.51,3310.3 X1.1@1253.51,3288.42 1279.58,3288.42 v3(1297,3271) ; v3(1495,3254) 1495,3274 1844,3623 v3(1864,3623)
  Bottom Layer w12: v3(1133,3271) v3(1297,3271) 1356,3212 1453,3212 v3(1495,3254) ; v3(1864,3623) 1991.39,3750.39 U10.6@2069.94,3750.39
XTAL2: C65.2 R76.2 U10.7 X1.3 | length 1256.1
  Top Layer w12: R76.2@1148,3215.17 1192.08,3215.17 X1.3@1192.49,3215.58 1192.49,3192.7 C65.2@1211.19,3174 1211.19,3146.81 1228,3130 1420,3130 1533.5,3243.5 1533.5,3282.5 1842,3591 1878,3591 v3(1907,3620)
  Bottom Layer w12: v3(1907,3620) 2011.8,3724.8 U10.7@2069.94,3724.8
pads on no net: "J9.#CD Switch" D7.3 J2.3 J3.23 J6.2 J6.MH1 J6.MH2 J7.2 J7.MP1 J7.MP2 J12.MH1 J12.MH2 J15.C6 J20.35 J21.MH1 J21.MH2 J21.MH3 J21.MH4 J25.1 J25.4 J25.5 J25.6 J25.7 J25.8 J25.9 J25.MH1 J25.MH2 SW1.2 SW1.4 SW2.2 SW2.4 SW3.2 SW3.4 SW4.2 SW4.4 SW5.2 SW5.4 SW6.2 SW6.4 U1.3 U1.4 U1.5 U1.6 U1.15 U1.21 U1.22 U3.6 U3.7 U3.8 U3.9 U3.15 U3.16 U3.21 U3.22 U3.23 U3.24 U3.25 U3.26 U3.27 U3.28 U3.29 U3.30 U3.31 U3.32 U3.33 U3.34 U3.35 U3.36 U3.42 U3.44 U3.45 U3.46 U3.47 U3.48 U3.49 U3.50 U3.52 U3.53 U3.55 U3.56 U3.59 U3.66 U3.67 U3.68 U3.69 U3.70 U3.71 U3.72 U3.73 U3.74 U3.75 U3.76 U3.81 U3.83 U3.84 U3.86 U4.10 U4.11 U4.60 U4.61 U4.62 U4.63 U4.64 U4.65 U4.66 U4.67 U4.68 U4.69 U4.70 U4.71 U4.72 U4.73 U4.74 U4.75 U4.76 U4.77 U4.80 U4.81 U4.82 U4.83 U4.84 U4.85 U4.86 U4.87 U4.88 U4.89 U4.91 U4.92 U4.93 U4.94 U4.95 U4.96 U4.97 U4.98 U4.99 U4.100 U4.102 U4.103 U4.104 U4.105 U4.106 U4.107 U4.108 U4.109 U4.110 U4.111 U4.145 U4.146 U4.151 U4.152 U4.153 U4.154 U4.155 U4.161 U4.167 U4.168 U4.170 U4.171 U4.172 U4.173 U4.174 U4.175 U4.176 U5.1 U5.2 U5.3 U5.4 U5.5 U5.6 U5.7 U5.14 U5.15 U5.16 U5.17 U5.19 U5.21 U6.3 U7.8 U7.9 U7.10 U7.12 U8.10 U10.11 U10.12 U10.14 U10.19 U10.20 U10.22 U12.11 U12.14 U13.6 U14.6
copper on no net: | length 15097.4
  Top Layer w10: -3.55,201.03 -2.58,202 v2(50,202) v3(435,202) ; -3.55,244.34 90.34,244.34 v2(91,245) v3(377,245) ; v2(53,505) 55.75,502.25 123.75,502.25 158,468 v2(506,468)
  Top Layer w12: -3.55,287.65 425.24,287.65 534.6,397 1011,397 v2(1121,507) ; -3.55,460.87 v3@92,460.87 ; -3.55,504.18 v2@53,504.18 ; v3(92,462) 137,462 181.43,417.57 869.57,417.57 v2(958,506) ; v2(141,530) 161,510 v2(558,510) ; 359.45,550.43 558.23,550.43 653,455.66 v2(653,447) ; 784.83,629 791.5,635.67 791.5,666 ; 983.83,629 991.5,636.67 991.5,666 ; 1182.83,629 1191.5,637.67 1191.5,666 ; 1245.63,3425.53 1246,3425.9 v3(1246,3505) ; v3(1324,3505) 1324,3425.9 1324.37,3425.53
  Bottom Layer w8: v2(-25,373) 20.83,373 21,373.17
  Bottom Layer w10: v2(50,202) 50,322 60.31,332.31 92,332.31 ; v2(53,505) 53,372 73,352 92,352 ; v2(91,245) 91,311.63 92,312.63 ; 92,371.68 v3(92,462) ; 1277.89,1134.06 1278,1133.95 1278,1045
  Bottom Layer w12: 21,394.83 21,525 47,551 120,551 v2(141,530) ; v3(377,245) 377,570 457,650 868,650 1018.05,800.05 1018.05,1134.06 ; v3(435,202) 435,547 495,607 896,607 1061.35,772.35 1061.35,1134.06 ; v2(506,468) 506,525 543,562 931,562 1104.66,735.66 1104.66,1134.06 ; v2(558,510) 591,477 1159,477 1234.58,552.58 1234.58,1134.06 ; v2(653,447) 1179,447 1277.89,545.89 1277.89,1134.06 ; v2(958,506) 1147.97,695.97 1147.97,1134.06 ; v2(1121,507) 1191.28,577.28 1191.28,1134.06 ; v3(1246,3505) 1276,3475 1380,3475 1388,3483 1915,3483 2028.84,3596.84 2069.94,3596.84 ; v3(1324,3505) 1908,3505 2025.43,3622.43 2069.94,3622.43

## Other copper
Top Layer:
  rectangle net PWR_ON#: 2183,2243 2228,2298
  rectangle net PWR_ON#: 2009,2268 2051,2302.5
  rectangle net "VCC 1P8_LDO": 1262,2872 1328,2924
  rectangle net VBAT: 1696,2684 1710,2890
  rectangle net GND: 2034.19,2051 2142.38,2103
  rectangle net GND: 537.41,2286 620,2341
  rectangle net GND: -52,1482 109,1647
  rectangle net GND: -16,2194 106,2416
  rectangle net GND: 41,3335 105,3468
  rectangle net GND: -52,3221 -1,3357
  rectangle net GND: 3123,2916 3291,2997
  region net "VCC 3P3_SYS": 1304.02,2839 1179,2839 1179,2757 1304.02,2757
  rectangle net GND: 1315.98,2756 1376,2839
  rectangle net GND: 1538,2759 1626,2839
  rectangle net VBAT: 1641,2654 1709,2747
  rectangle net GND: -33,65 115,140
  region net GND: 470,1123 470,1217 316,1217 316,1123
  rectangle net GND: -40,1071 331,1173
  rectangle net GND: -52,1055 32,1173
  rectangle net GND: 263,545 330,636
  rectangle net GND: -34,529 33,669
  rectangle net LVDS_VDD: 3334,2615 3365,2640
  rectangle net NetC7_1: 3376,2615.87 3438,2657
  rectangle net LVDS_VDD: 3299,2615 3347,2700
  rectangle net "VCC 3P3_SYS": 3333,2368 3424,2467
  rectangle net GND: 3299,2475 3442,2608
  rectangle net NetD12_2: 3307,2954 3405,3073
  rectangle net VBAT_USB: 3106,3119 3275,3224
  rectangle net GND: 3123,2883 3315,2944
  rectangle net VBAT_USB: 3125,2839 3314,2875
  rectangle net GND: 3244,2911 3422,2944
  rectangle net GND: 1113,3304 1188,3495
  rectangle net DC5V_OTG: 3087,3701.37 3175,3746
  rectangle net GND: 3412,2867 3451,2990
  rectangle net GND: 2033,2207 2141.19,2259
  rectangle net VBAT: 1642,1383 1706,1541
  rectangle net GND: 1602,1070 2108,1185
  rectangle net VBAT: 1601,1318 2109,1438
  rectangle net "VCC 3P3_SYS": 2081,887 2125,929
  rectangle net LVDS_VDD: 3529,2913 3648,2997
  rectangle net VBAT_SYS: 3528,3036 3576,3149
  rectangle net GND: 2971.23,3738 2994.23,3800
  rectangle net DC5V_OTG: 3080,3701.37 3103,3800
  rectangle net GND: 1158,3269 1218,3340
  region net VBAT_SYS: 830.34,3381.01 797,3381.01 797,3285 830.34,3285
  rectangle net VBAT: 803,3642 870,3736
  rectangle net VCC1P0_CORE_DC: 799,3428.99 827.58,3477.42
  rectangle net VCC1P0_CORE_DC: 723,3456 828.18,3497
  rectangle net FB: 838,3455 893,3482
  rectangle net FB: 872,3431.57 893,3480
  rectangle net GND: 850,3392 936,3419
  region net GND: 863,3911 816.68,3911 816.68,3814 863,3814
  rectangle net GND: 816.37,3777.11 828.37,3846
  rectangle net VBAT: 738,3814 789,3910
  rectangle net VBAT: 777,3777.11 789,3846
  region net 5V_IN: 585,3582 372,3582 372,3461 585,3461
  region net 5V_IN: 586,3830 488,3830 488,3461 586,3461
  rectangle net GND: 41,3468 254,3589
  rectangle net GND: 161,3468 254,3909
Bottom Layer:
  rectangle net VBAT_SYS#: 161,-38 248,132
  rectangle net GND: 70,3698 256,3910
  rectangle net CAM_1.8V: 27,1828 65,1943.12
  rectangle net GND: 261,3254 427,3426
  rectangle net VBAT: 438,3241 712,3426
  rectangle net "VCC 3P3_SYS": 3373,2425 3400.03,2447
  rectangle net VBAT_USB: 2992.17,2837 3217,3208
  rectangle net NetD12_2: 3235,3019 3420,3199
  rectangle net GND: 2912,3621 2964,3679
  rectangle net GND: 3148,3614 3209,3658
  rectangle net DC5V_OTG: 3071,3689 3210,3743
  rectangle net GND: 3410,2848 3614,2903
  rectangle net GND: 2917,3647 3209,3679
  rectangle net GND: 910,3410 1001,3467
  rectangle net VBAT_SYS: 917.23,3068 990.23,3166
  region net VBAT_SYS: 855.59,3415 779,3415 779,3281 855.59,3281
  rectangle net GND: 864.41,3307 935.41,3335
  rectangle net GND: 864.41,3509 935.41,3537
  rectangle net GND: 831.23,3068.63 902.23,3167
  rectangle net VCC1P0_CORE_DC: 658,3133 729,3182
  rectangle net VBAT: 747,3070 817,3166
  region net GND: 935,3864 935,3911 634,3911 634,3864
  rectangle net GND: 874,3307 942,3909
  rectangle net VBAT: 740,3639 867,3733
  rectangle net VCC1P0_CORE_DC: 722,3429 855,3533
  rectangle net GND: 436,3698 649,3911
  region net GND: 642.16,3741.89 630.16,3741.89 630.16,3673 642.16,3673
  region net GND: 935,3870 807,3870 807,3741 935,3741
  rectangle net VBAT: 736,3638 795,3854
  rectangle net 5V_IN: 20,3464 250,3666
  rectangle net 5V_IN: 102.17,3461 563,3552
  rectangle net GND: 74,3816 563,3910

## Silkscreen, mask and mechanical layers (free items; w line width, h text height)
Top Overlay:
  drawing of 3078 lines, arcs and shapes, not listed
  text "ZERO CARBON FOOTPRINT" at 7101,5981 h38
  text "#" at 3150.17,3515 h40
  text "#" at 3151,3425.53 h40
  text "*" at 3083,3036 h40
  text "*" at 1264,2939 h40
  text "*" at 1252,2750 h40
  text "*" at 3352,2634 h40
  text "BOOT_CFG1" at 2123,2602 h60
  text "*" at 3363,2548 h40
  text "BOOT_CFG0" at 2123,2493 h60
  text "*" at 3417,2450 h40
  text "PWR_ON" at 2277,2260 h60
  text "*" at 2009,2185 h40
  text "#" at 2006,2058 h40
  text "* >> 0.1uF" at 3244,705 h50
  text "# >> 10K" at 3248,630 h50
  text "*" at 2070,605 h40
  text "*" at 2180,569 h40
  text "*" at 2133,568 h40
  text "*" at 2219,568 h40
  text "^ >> 22R" at 3251,551 h50
  text "*" at 229,24 h40
Bottom Overlay:
  drawing of 3109 lines, arcs and shapes, not listed
  text "*" at 813,3847 h40
  text "*" at 1719,3768 h40
  text "*" at 3158,3707 h40
  text "#" at 1721,3672 h40
  text "*" at 681,3642 h40
  text "*" at 2186,3629 h40
  text "*" at 2131,3541 h40
  text "*" at 875,3534 h40
  text "#" at 2023,3451 h40
  text "*" at 492,3409 h40
  text "*" at 875,3270 h40
  text "^" at 82,3246 h35
  text "^" at 82,3222 h35
  text "^" at 82,3196 h35
  text "#" at 3647,3173 h40
  text "^" at 82,3169 h35
  text "^" at 82,3143 h35
  text "^" at 81,3116 h35
  text "*" at 3602,3112 h40
  text "^" at 81,3091 h35
  text "^" at 82,3066 h35
  text "^" at 82,3037 h35
  text "#" at 309,3016 h40
  text "^" at 81,3012 h35
  text "^" at 81,2985 h35
  text "^" at 82,2959 h35
  text "^" at 81,2933 h35
  text "^" at 81,2906 h35
  text "#" at 353,2901 h40
  text "^" at 81,2883 h35
  text "^" at 81,2852 h35
  text "^" at 81,2828 h35
  text "^" at 81,2803 h35
  text "#" at 2898,2781 h40
  text "^" at 80,2776 h35
  text "#" at 1506,2753 h40
  text "^" at 82,2750 h35
  text "^" at 81,2724 h35
  text "^" at 81,2699 h35
  text "^" at 81,2674 h35
  text "^" at 82,2648 h35
  text "^" at 82,2622 h35
  text "^" at 81,2595 h35
  text "^" at 81,2570 h35
  text "^" at 82,2546 h35
  text "*" at 3248,2533 h40
  text "^" at 82,2519 h35
  text "^" at 81,2492 h35
  text "*" at 3223,2483 h40
  text "^" at 81,2465 h35
  text "#" at 3184,2452 h40
  text "^" at 82,2440 h35
  text "^" at 79,2422 h35
  text "#" at 3554,2384 h40
  text "#" at 2953,2067 h40
  text "#" at 2956,1125 h40
  text "* >> 0.1uF" at 3691,706 h50
  text "#" at 2959,657 h40
  text "# >> 10K" at 3687,631 h50
  text "^ >> 22R" at 3684,552 h50
  text "ZERO CARBON FOOTPRINT" at 2057,487 h38
  text "*" at 419,157 h40
Mechanical 2:
  lines w10: -62,-65 5652,-65 5652,3970 -62,3970 -62,-65

## Dimensions
-62,3970 to -62,-65 on Mechanical 1
5652,3970 to -62,3970 on Mechanical 1